# Altium PCB GR_Propulsion (1).PcbDoc
Units mm, origin at the board's own origin, x right, y up, seen from the top; angles counter-clockwise.
Board outline 70 x 47.5 mm, 2 copper layers (Top Layer, Bottom Layer), stack 1.586 mm thick; 21 components, 12 nets, 79 pads, 6 vias.
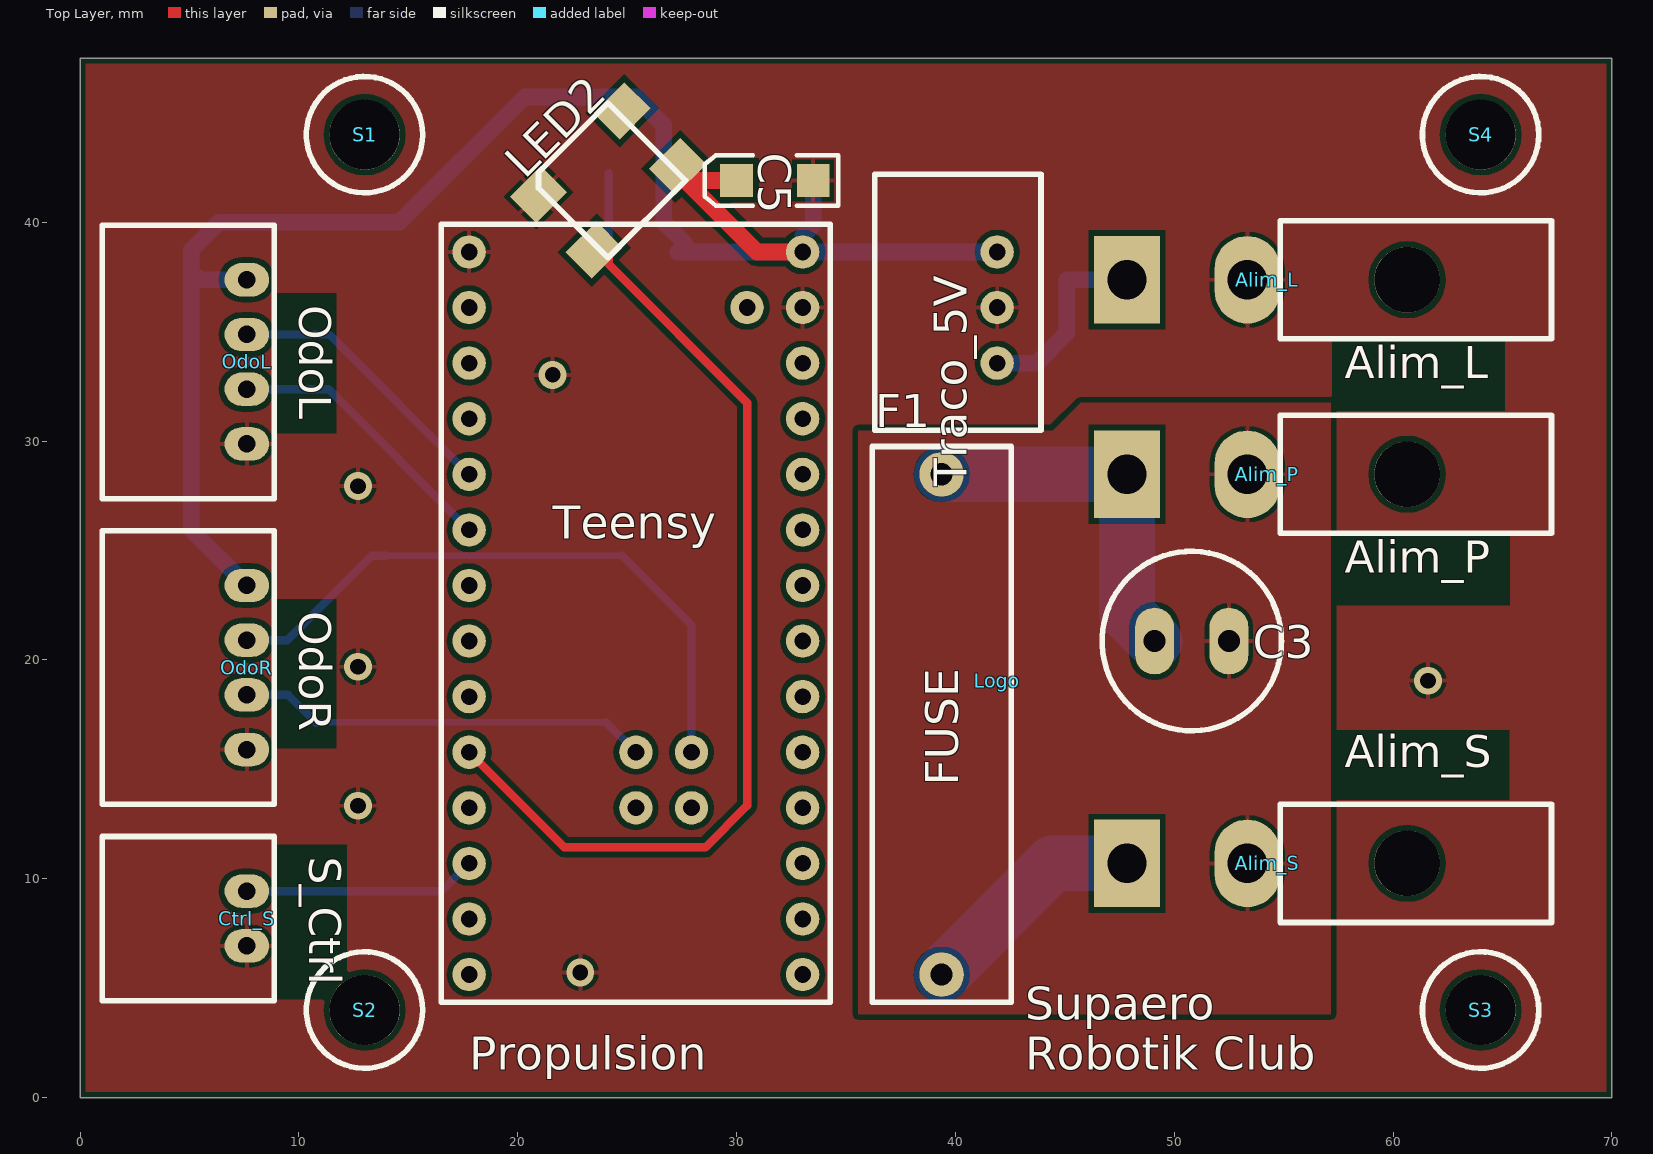
[diagram p0: Top Layer view]
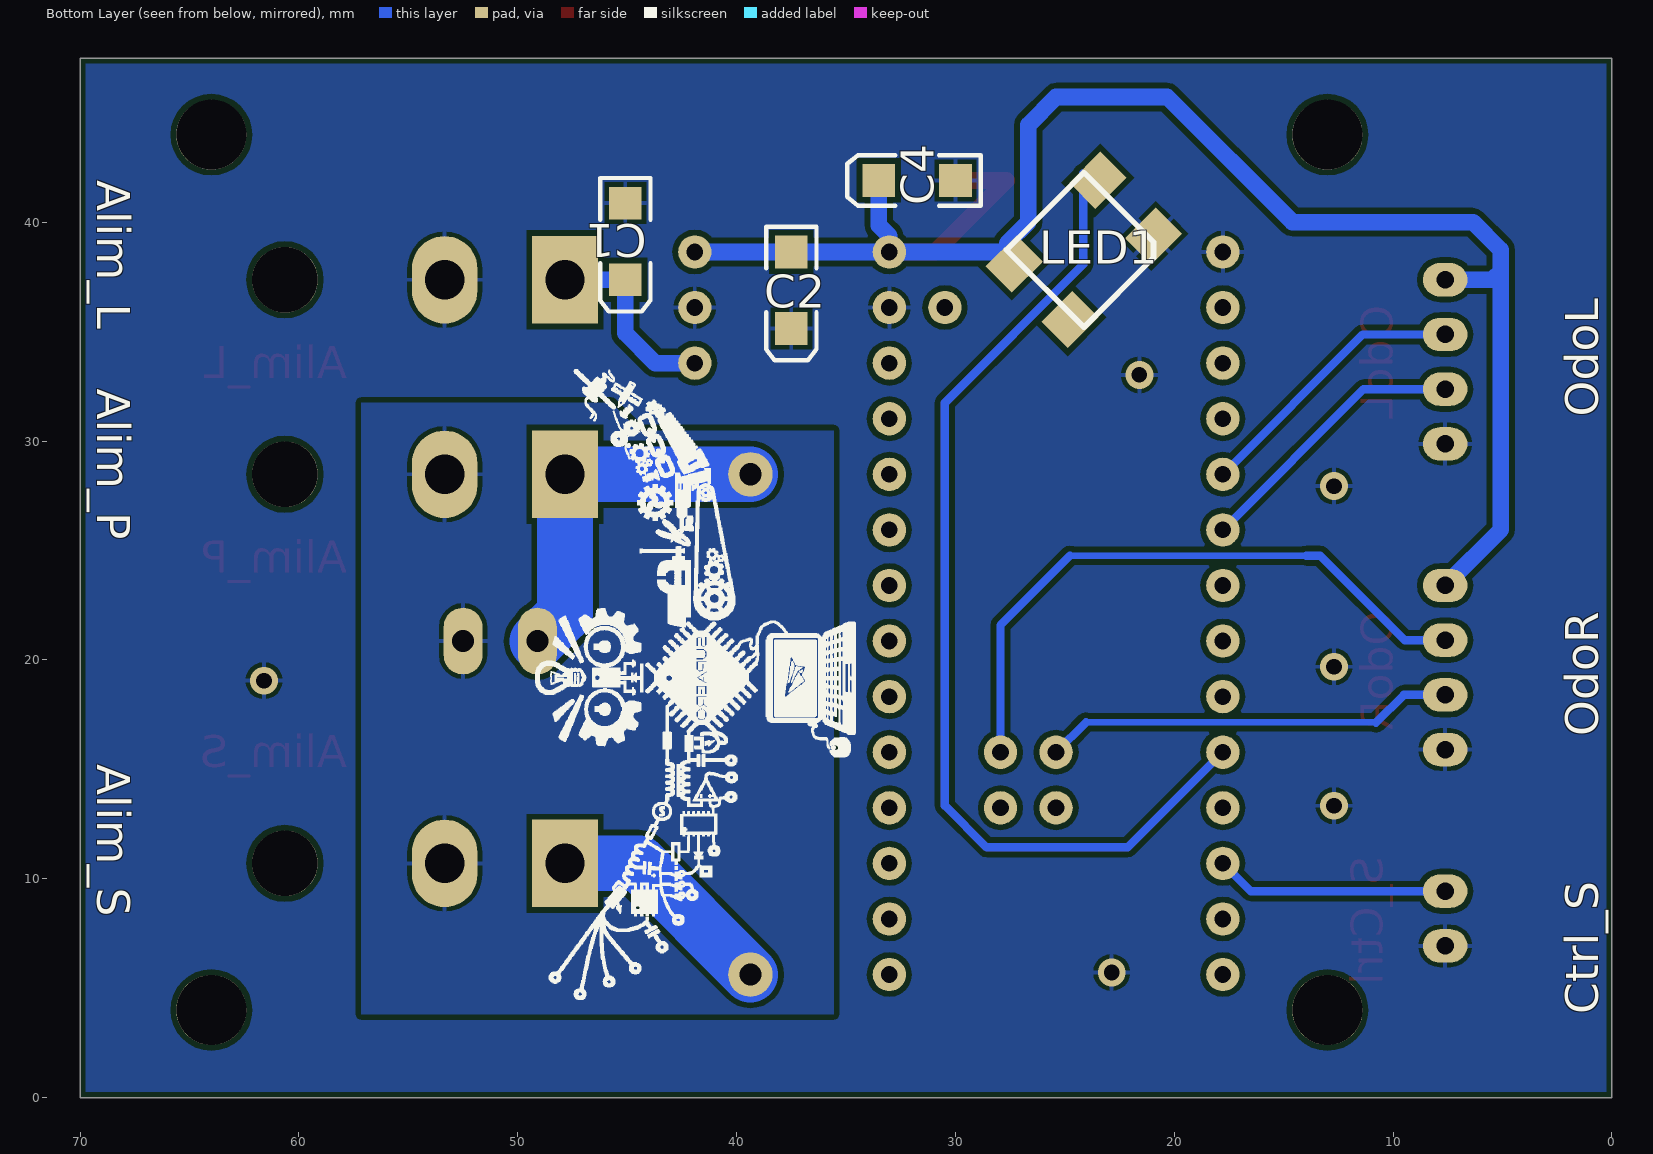
[diagram p1: Bottom Layer view, seen from below]
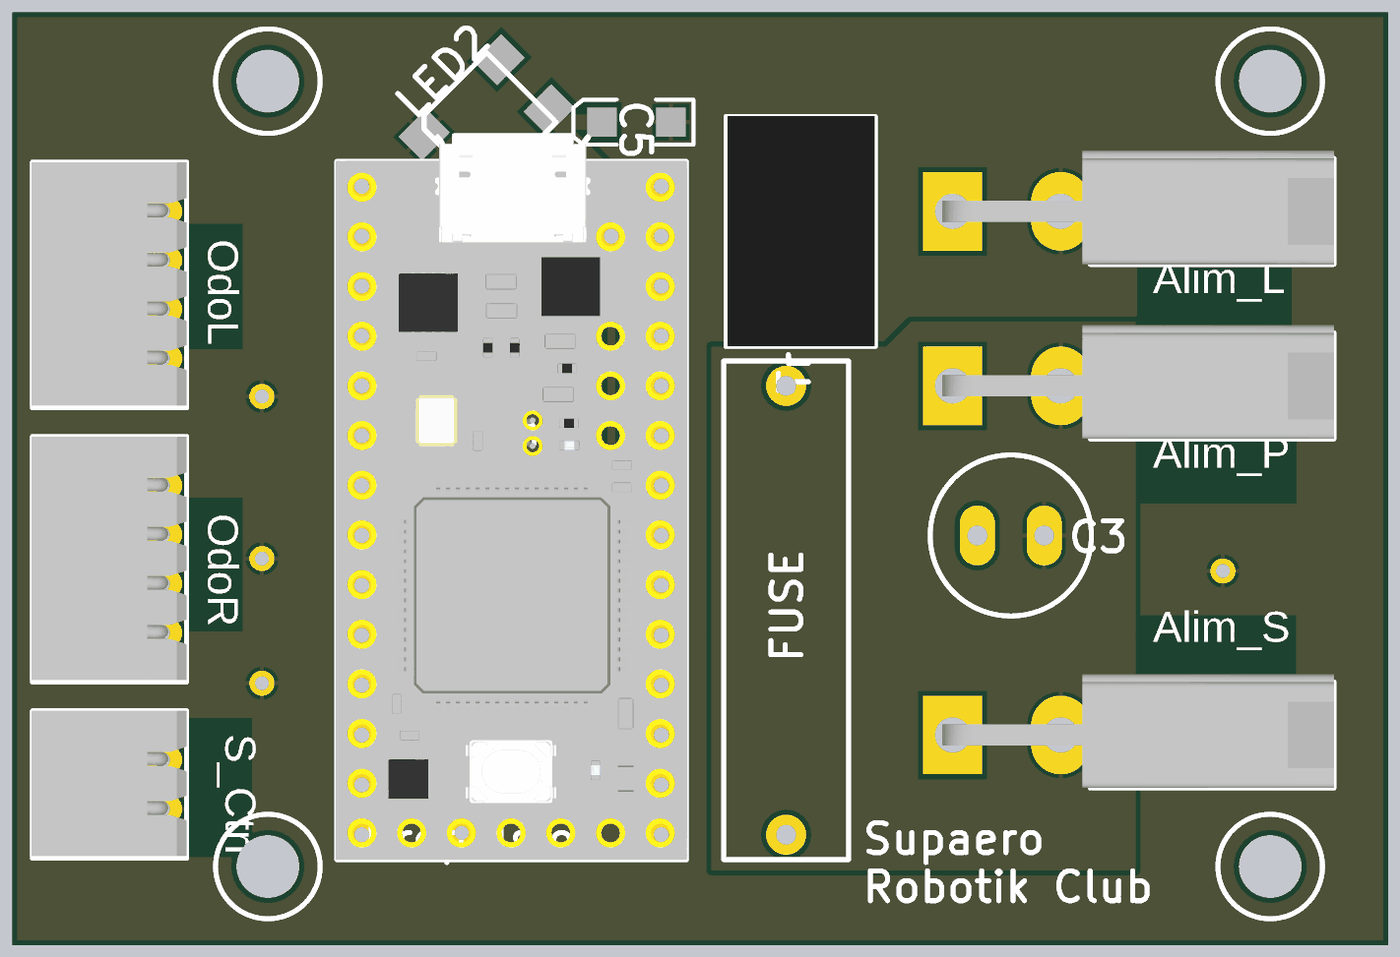
[diagram p2: 3D render of the assembled board from above, using the file's embedded part models]

## Layer stack, top to bottom
Top Solder: solder mask 0.0102, Solder Resist, Dk 3.5
Top Layer: signal copper 0.018
Dielectric1: core 1.55, FR-4, Dk 4.8
Bottom Layer: signal copper 0.018
Bottom Solder: solder mask 0.0102, Solder Resist, Dk 3.5

## Board outline
0,0 0,47.5 70,47.5 70,0

## Design rules (kind name [scope] priority, off if disabled: settings)
BoardOutlineClearance [All] p1: gap=0.25 except(0: Arc-SplitContinuation Track-SplitContinuation SMDPad-SplitContinuation THPad-SplitContinuation Via-SplitContinuation Fill-SplitContinuation Poly-SplitContinuation Region-SplitContinuation Text-SplitContinuation)
Clearance Clearance-xPP-xTP-xTT [All] p1: gap=0.254
ComponentClearance [All] p1: gap=0.25 collisioncheckmode=3 verticalgap=0.25 showdistances=FALSE
ComponentClearance ComponentClearance_1 [InComponent('Logo')] p2: gap=0 collisioncheckmode=3 verticalgap=0 showdistances=FALSE
DiffPairsRouting [All] p1: maxlimit=0.25 minlimit=0.25 mostfreqgap=0.25 toplayer_minwidth=0.381 toplayer_maxwidth=0.381 toplayer_prefwidth=0.381 bottomlayer_minwidth=0.381 bottomlayer_maxwidth=0.381 bottomlayer_prefwidth=0.381 maxuncoupledlength=12.5
Height [All] p1: minheight=0 maxheight=25 prefheight=12.5
HoleSize HoleSize-PTH [All] p1: absolutevalues=TRUE maxlimit=2 minlimit=0.25 maxpercent=80.000 minpercent=20.000
HoleToHoleClearance [All] p1: gap=0.35 allowstackedmicrovias=TRUE
MinimumAnnularRing "Minimum IAR  >0.45mm" [((ObjectKind = 'Pad') OR (ObjectKind = 'Via')) And (Layer = 'MultiLayer') And (HoleDiameter > AsMM(0.45))] p1: minimumring=0.175 // minimum inner annular ring for pads > 0.45mm finished hole size
MinimumAnnularRing "Minimum IAR <=0.45mm" [((ObjectKind = 'Pad') OR (ObjectKind = 'Via')) And (Layer = 'MultiLayer') And (HoleDiameter <= AsMM(0.45))] p2: minimumring=0.175 // minimum inner annular ring for pads <= 0.45mm finished hole size
MinimumSolderMaskSliver [All] p1: minsoldermaskwidth=0.08
PlaneClearance PlaneClearance-IPI [All] p1: clearance=0.25
PlaneConnect [All] p1: planeconnectstyle=Relief reliefexpansion=0.175 reliefentries=4 reliefconductorwidth=0.2 reliefairgap=0.2
PolygonConnect PolygonConnect-xTW [All] p1: connectstyle=Relief reliefconductorwidth=0.2 reliefentries=4 polygonreliefangle="90 Angle" airgapwidth=0.2
RoutingCorners [All] p1: cornerstyle=45-Degree minsetback=2.5 maxsetback=2.5
RoutingVias "RoutingVias > 0.45mm" [(ObjectKind = 'Via') And (HoleDiameter > AsMM(0.45))] p1: holewidth=0.5 width=0.85 viastyle="Through Hole" minholewidth=0.5 minwidth=0.85 maxholewidth=0.9 maxwidth=1.25 // finishet hole size > 0.45mm
RoutingVias "RoutingVias <= 0.45mm" [(ObjectKind = 'Via') And (HoleDiameter <= AsMM(0.45))] p2: holewidth=0.3 width=0.65 viastyle="Through Hole" minholewidth=0.25 minwidth=0.6 maxholewidth=0.45 maxwidth=0.8 // finishet hole size <= 0.45mm
SilkToSilkClearance [All] p1: silktosilkclearance=0.2
SilkToSolderMaskClearance SilkscreenOverComponentPads [IsPad] p1: minsilkscreentomaskgap=0.2 clearancetoexposedcopper=TRUE
SolderMaskExpansion [All] p1: expansion=0
Width Width-xTW [All] p1: maxlimit=2.54 minlimit=0.254 preferedwidth=0.508
19 further rules are at their usual default settings.

## Components (designator, comment, footprint, x,y, rotation, side; value= is the part's Value field where it differs from the comment)
Alim_L "Minifit Jr 2x1H" MOLEX_MINIFITJR_2X1H 53.34,37.37 r0 top
Alim_P "Minifit Jr 2x1H" MOLEX_MINIFITJR_2X1H 53.34,28.48 r0 top
Alim_S "Minifit Jr 2x1H" MOLEX_MINIFITJR_2X1H 53.34,10.7 r0 top
C1 "Cap22uF" 3.2X1.6X1.1 45.085,39.12 r270 bottom
C2 "Cap50uF" 3.2X1.6X1.1 37.5,36.89 r270 bottom
C3 "Cap50uF" CONDENSATEUR 50.8,20.86 r0 top
C4 "Cap" 3.2X1.6X1.1 31.75,41.91 r0 bottom
C5 "Cap" 3.2X1.6X1.1 31.75,41.91 r180 top
Ctrl_S "SPOX 2x1H" "MOLEX SPOX 2X1H" 7.62,9.43 r270 top
F1 "10A" FUSE 39.37,17.05 r90 top
LED1 "NeoPixel" NEOPIXEL 24.13,38.735 r135 bottom
LED2 "NeoPixel" NEOPIXEL 24.13,41.91 r225 top
Logo "Logo" LOGO_HIGHRES 41.91,19.05 r270 top
OdoL "SPOX 4x1H" "MOLEX SPOX 4X1H" 7.62,37.37 r270 top
OdoR "SPOX 4x1H" "MOLEX SPOX 4X1H" 7.62,23.4 r270 top
S1 "Screw M3" "SCREW M3" 13,44 r0 top
S2 "Screw M3" "SCREW M3" 13,4 r0 top
S3 "Screw M3" "SCREW M3" 64,4 r0 top
S4 "Screw M3" "SCREW M3" 64,44 r0 top
Teensy "Teensy 3.2" TEENSY 15.24,18.32 r0 top
Traco_5V "Traco TRS2-2450" TRS 41.91,33.56 r270 top

## Footprints (in the part's own frame and the unit in brackets; to place one, negate y for a bottom-side part, rotate by r counter-clockwise, add the part's x,y. Pads: shape width x height; smd on the part's side, far side on the other; paste and mask are expansions set on the pad)
3.2X1.6X1.1 [mm] "SMT LED; 2 Flat Leads"
  rect 1.5x1.5 smd: 1(-1.75,0) 2(1.75,0)
  silkscreen extent -2.9,-1.15 3.2,1.15
CONDENSATEUR [mil]
  oval 70x120 hole 40: 1(-66.93,0) 2(66.93,0)
  silkscreen extent -161,-161 161,161, body extent -161,-161 161,161, height 394
FUSE [mil]
  round 80 hole 40: 1(-450,0) 2(450,0)
  silkscreen extent -500,-125 500,125, body extent -505,-130 505,130, height 315
LOGO_HIGHRES [mm]
"MOLEX SPOX 2X1H" [mil] "Prise CI, Molex, 3 Contacts, 1 rangée, entraxe 2.5mm, 3A, Coudé, ref 22-03-5035"
  oval 60x80 hole 31.5: 1(0,0) 2(98.43,0)
  silkscreen extent -98,-260 197,49, body extent -98,-262 193,49, height 193
"MOLEX SPOX 4X1H" [mil] "Prise CI, Molex, 3 Contacts, 1 rangée, entraxe 2.5mm, 3A, Coudé, ref 22-03-5035"
  oval 60x80 hole 31.5: 1(0,0) 2(98.43,0) 3(196.85,0) 4(295.28,0)
  silkscreen extent -98,-260 394,49, body extent -98,-262 390,49, height 193
MOLEX_MINIFITJR_2X1H [mm] "Connecteur Molex 2"
  rect 3x4 hole 1.8: 1(-5.5,0)
  oval 3x4 hole 1.8: 2(0,0)
  round 3 hole 3 unplated: 3(7.3,0)
  silkscreen extent 1.5,-2.7 13.9,2.7, body extent -6.03,-2.7 13.9,3.1, height 11.01
NEOPIXEL [mm]
  rect 2x1.7 smd: 1(2.7,-1.8) 2(2.7,1.8) 3(-2.7,1.8) 4(-2.7,-1.8)
  silkscreen extent -2.5,-2.5 2.5,2.5, body extent -2.5,-2.5 2.5,2.5, height 1.6
"SCREW M3" [mm] "M3 iso Screw"
  round 3.2 hole 3.2 unplated: 0(0,0)
  silkscreen extent -2.66,-2.66 2.66,2.66
TEENSY [mil] "Teensy 3.2"
  round 60 hole 30: 0(100,700) 1(100,600) 2(100,500) 3(100,400) 4(100,300) 5(100,200) 6(100,100) 7(100,0) 8(100,-100) 9(100,-200) 10(100,-300) 11(100,-400) 12(100,-500) 13(700,-500) 14(700,-400) 15(700,-300) 16(700,-200) 17(700,-100) 18(700,0) 19(700,100) 20(700,200) 21(700,300) 22(700,400) 23(700,500) 25(400,-100) 26(400,-200) 31(500,-200) 32(500,-100) 41(700,600) 42(700,700) 43(700,800) 44(100,800) 50(600,700)
  silkscreen extent 50,-550 750,850, body extent 48,-550 752,907, height 505
TRS [mil]
  round 60 hole 30: 1(0,0) 2(-100,0) 3(-200,0)
  silkscreen extent -340,-220 121,79, body extent -341,-218 120,78, height 398

## Part data
Alim_L Alim_P Alim_S: library part "Header 2", "Molex Minifit Jr 2x1H"
C1 C2 C3: library part Cap, "Capacitor"
C4 C5: "Capacitor"
Ctrl_S: library part "Header 2", "Molex SPOX Jr 2x1H"
F1: library part "Fuse 1", "Fuse"
OdoL OdoR: library part "Header 4H", "Molex SPOX 4x1H"
Teensy: library part teensy3.2
Traco_5V: library part "Volt Reg", "Voltage Regulator"

## Via types
v1: diameter 1.27, hole 0.711, Top Layer to Bottom Layer, 6 vias

## Nets (pads, with @x,y where several pads share a name; then routed paths per layer and width w, separated by ;. In a path a pad name is that pad's centre, name@x,y a point inside that pad or via, vN(x,y) a via of type N, cw(c..) or ccw(c..) an arc to the next point about the centre after c; other vN are vias at no path point)
5VL: C2.1 C4.2 C5.2 LED1.3 LED2.3 OdoL.1 OdoR.1 Teensy.43 Traco_5V.3 | length 77
  Top Layer w0.762: C5.2 27.666,41.91 30.936,38.64 Teensy.43
  Bottom Layer w0.762: 5.27,37.56 5.46,37.37 OdoL.1 ; OdoR.1 5.08,25.94 5.08,38.735 6.35,40.005 14.605,40.005 20.32,45.72 25.4,45.72 26.67,44.45 26.67,40.005 27.63,39.045 LED1.3@27.63,38.77 ; LED1.3@27.305,38.64 Teensy.43 ; C4.2 33.5,39.85 33.02,39.37 Teensy.43 ; Traco_5V.3 C2.1 Teensy.43
24VL: Alim_L.1 C1.2 Traco_5V.1 | length 8.9
  Bottom Layer w0.762: Traco_5V.1 43.72,33.56 45.085,34.925 C1.2 Alim_L.1
24VP: Alim_P.1 C3.1 F1.2 | length 16.6
  Bottom Layer w2.54: F1.2 Alim_P.1 47.84,22.12 C3.1
24VS: Alim_S.1 F1.1 | length 10.6
  Bottom Layer w2.54: F1.1 44.45,10.7 Alim_S.1
A_L: OdoL.2 Teensy.3 | length 12.8
  Bottom Layer w0.381: OdoL.2 11.39,34.87 Teensy.3
A_R: OdoR.2 Teensy.32 | length 29.1
  Bottom Layer w0.305: 13.97,24.765 24.765,24.765
  Bottom Layer w0.381: OdoR.2@7.675,20.955 OdoR.2 9.47,20.9 13.335,24.765 13.97,24.765 ; 24.765,24.765 27.94,21.59 Teensy.32
B_L: OdoL.3 Teensy.4 | length 12.8
  Bottom Layer w0.381: OdoL.3 11.35,32.37 Teensy.4
B_R: OdoR.3 Teensy.25 | length 18.9
  Bottom Layer w0.305: 10.795,17.145 24.035,17.145
  Bottom Layer w0.381: OdoR.3 9.51,18.4 10.78,17.13 ; 24.035,17.145 Teensy.25
DIN: LED1.2 LED2.2 Teensy.8 | length 89.8
  Top Layer w0.381: Teensy.8 22.13,11.43 28.575,11.43 30.48,13.335 30.48,31.75 24.165,38.065 LED2.2@24.165,38.41
  Bottom Layer w0.381: Teensy.8 22.13,11.43 28.575,11.43 30.48,13.335 30.48,31.75 24.165,38.065 LED1.2@24.165,42.235
GND: Alim_L.2 C1.1 C2.2 C4.1 C5.1 Ctrl_S.2 LED1.1 LED2.1 OdoL.4 OdoR.4 Teensy.42 Teensy.44 Traco_5V.2
  other v1: 22.86,5.715 12.7,13.335 61.595,19.05 12.7,19.685 12.7,27.94 21.59,33.02
GNDP: Alim_P.2 Alim_S.2 C3.2
TX_SABER: Ctrl_S.1 Teensy.10 | length 10.7
  Bottom Layer w0.381: Ctrl_S.1 16.51,9.43 Teensy.10
pads on no net: Alim_L.3 Alim_P.3 Alim_S.3 LED1.4 LED2.4 S1.0 S2.0 S3.0 S4.0 Teensy.0 Teensy.1 Teensy.2 Teensy.5 Teensy.6 Teensy.7 Teensy.9 Teensy.11 Teensy.12 Teensy.13 Teensy.14 Teensy.15 Teensy.16 Teensy.17 Teensy.18 Teensy.19 Teensy.20 Teensy.21 Teensy.22 Teensy.23 Teensy.26 Teensy.31 Teensy.41 Teensy.50

## Polygon pours and split planes (outlines as drawn)
GND on Top Layer "Bottom Layer-GND" (solid, pour order 12): 0,0 70,0 70,47.5 0,47.5
GNDP on Top Layer "GNDP_L01_P004" (solid, pour order 4): 35.56,30.48 44.45,30.48 45.72,31.75 57.15,31.75 57.15,3.81 35.56,3.81
GND on Bottom Layer "Bottom Layer-GND" (solid, pour order 14): 0,0 70,0 70,47.5 0,47.5
GNDP on Bottom Layer "GNDP_L02_P000" (solid, pour order 0): 35.56,30.48 44.45,30.48 45.72,31.75 57.15,31.75 57.15,3.81 35.56,3.81

## Other copper
Top Layer:
  text "OdoL" at 9.525,36.195 h2.5 r270
  text "Alim_L" at 57.785,32.385 h2.5
  text "Alim_P" at 57.785,23.495 h2.5
  text "OdoR" at 9.525,22.225 h2.5 r270
  text "Alim_S" at 57.785,14.605 h2.5
  text "S_Ctrl" at 10,11 h2.5 r270

## Silkscreen, mask and mechanical layers (free items; w line width, h text height)
Top Overlay:
  text "OdoL" at 9.525,36.195 h2.5 r270
  text "Alim_L" at 57.785,32.385 h2.5
  text "Alim_P" at 57.785,23.495 h2.5
  text "OdoR" at 9.525,22.225 h2.5 r270
  text "Alim_S" at 57.785,14.605 h2.5
  text "S_Ctrl" at 10,11 h2.5 r270
  text "Propulsion" at 17.78,1.27 h1.52
  text "Supaero / Robotik Club" at 43.18,1.27 h1.52
Mechanical 15:
  the board outline again, w0.2

## Dimensions
0,0 to 0,47.5 on Mechanical 1
0,0 to 70,0 on Mechanical 1
13,4 to 0,0 on Mechanical 1
13,4 to 0,0 on Mechanical 1
64,4 to 70,0 on Mechanical 1
70,0 to 64,4 on Mechanical 1
70,47.5 to 64,44 on Mechanical 1
64,44 to 70,47.5 on Mechanical 1
13,44 to 0,47.5 on Mechanical 1
13,44 to 0,47.5 on Mechanical 1

## Text inside footprints (layer, text, board x,y; h text height)
F1: Top Overlay "FUSE" at 40.132,14.256 h1.52 r90